# Altium PCB BOARD_2LAYER.PcbDoc (part 3 of 7)
Units mil, origin at the board's own origin, x right, y up, seen from the top; angles counter-clockwise.
Board outline 9842.52 x 9842.52 mil, 2 copper layers (Top Layer, Bottom Layer), stack 34.252 mil thick; 276 components, 129 nets, 793 pads, 303 vias.
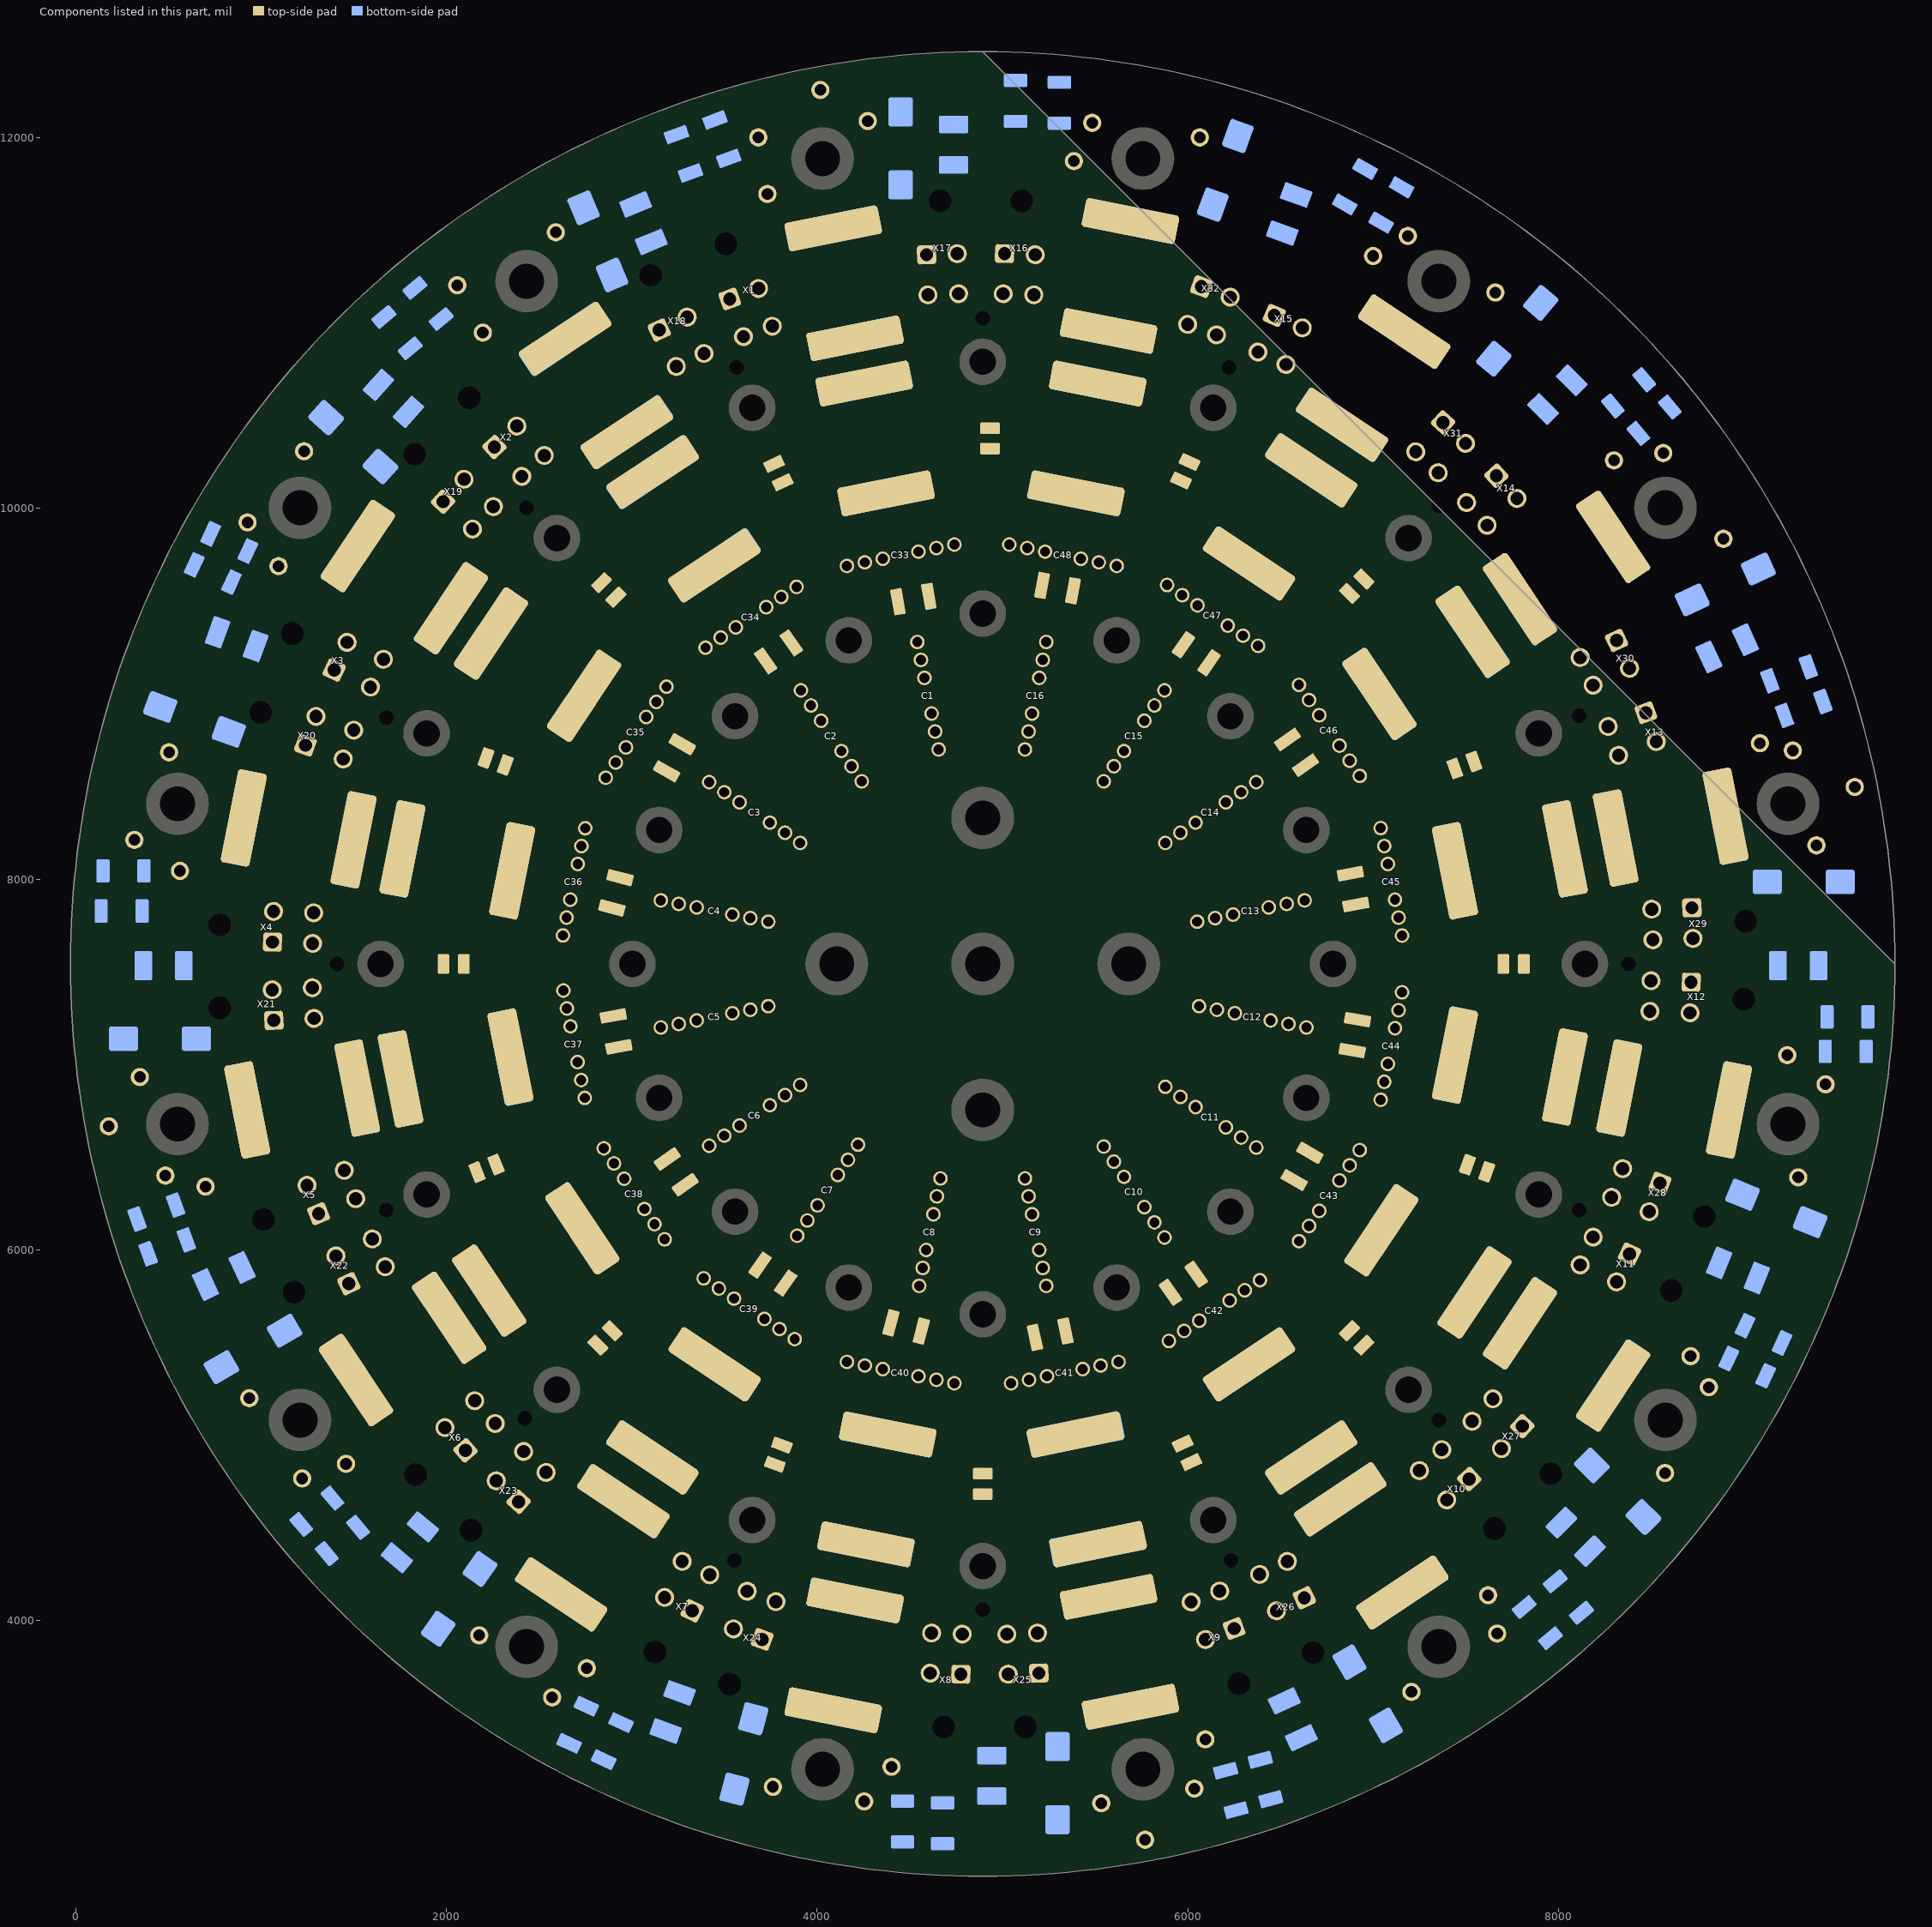
[diagram p3: the components of this part, seen from the top]

## Design rules (kind name [scope] priority, off if disabled: settings) (continued)
PolygonConnect PolygonConnect_In_$1N5825_L01_P153 [IsNamedPolygon('$1N5825_L01_P153')] p194: thpad.connectstyle=Relief thpad.reliefconductorwidth=29.53 thpad.reliefentries=4 thpad.polygonreliefangle="90 Angle" thpad.airgapwidth=19.68 smdpad.connectstyle=Relief smdpad.reliefconductorwidth=39.37 smdpad.reliefentries=4 smdpad.polygonreliefangle="90 Angle" smdpad.airgapwidth=9.84 via.connectstyle=Direct via.reliefconductorwidth=5.12 via.reliefentries=2 via.polygonreliefangle="90 Angle" via.airgapwidth=0
PolygonConnect PolygonConnect_In_$1N5825_L02_P152 [IsNamedPolygon('$1N5825_L02_P152')] p195: thpad.connectstyle=Relief thpad.reliefconductorwidth=29.53 thpad.reliefentries=4 thpad.polygonreliefangle="90 Angle" thpad.airgapwidth=19.68 smdpad.connectstyle=Relief smdpad.reliefconductorwidth=39.37 smdpad.reliefentries=4 smdpad.polygonreliefangle="90 Angle" smdpad.airgapwidth=9.84 via.connectstyle=Direct via.reliefconductorwidth=5.12 via.reliefentries=2 via.polygonreliefangle="90 Angle" via.airgapwidth=0
PolygonConnect PolygonConnect_In_$1N5272_L01_P105 [IsNamedPolygon('$1N5272_L01_P105')] p196: thpad.connectstyle=Relief thpad.reliefconductorwidth=29.53 thpad.reliefentries=4 thpad.polygonreliefangle="90 Angle" thpad.airgapwidth=19.68 smdpad.connectstyle=Relief smdpad.reliefconductorwidth=39.37 smdpad.reliefentries=4 smdpad.polygonreliefangle="90 Angle" smdpad.airgapwidth=9.84 via.connectstyle=Direct via.reliefconductorwidth=5.12 via.reliefentries=2 via.polygonreliefangle="90 Angle" via.airgapwidth=0
PolygonConnect PolygonConnect_In_~OUT_L01_P032 [IsNamedPolygon('~OUT_L01_P032')] p197: thpad.connectstyle=Relief thpad.reliefconductorwidth=29.53 thpad.reliefentries=4 thpad.polygonreliefangle="90 Angle" thpad.airgapwidth=19.68 smdpad.connectstyle=Relief smdpad.reliefconductorwidth=39.37 smdpad.reliefentries=4 smdpad.polygonreliefangle="90 Angle" smdpad.airgapwidth=9.84 via.connectstyle=Direct via.reliefconductorwidth=5.12 via.reliefentries=2 via.polygonreliefangle="90 Angle" via.airgapwidth=0
PolygonConnect PolygonConnect_In_$1N6109_L01_P181 [IsNamedPolygon('$1N6109_L01_P181')] p198: thpad.connectstyle=Relief thpad.reliefconductorwidth=29.53 thpad.reliefentries=4 thpad.polygonreliefangle="90 Angle" thpad.airgapwidth=19.68 smdpad.connectstyle=Relief smdpad.reliefconductorwidth=39.37 smdpad.reliefentries=4 smdpad.polygonreliefangle="90 Angle" smdpad.airgapwidth=9.84 via.connectstyle=Direct via.reliefconductorwidth=5.12 via.reliefentries=2 via.polygonreliefangle="90 Angle" via.airgapwidth=0
PolygonConnect PolygonConnect_In_$1N5819_L01_P146 [IsNamedPolygon('$1N5819_L01_P146')] p199: thpad.connectstyle=Relief thpad.reliefconductorwidth=29.53 thpad.reliefentries=4 thpad.polygonreliefangle="90 Angle" thpad.airgapwidth=19.68 smdpad.connectstyle=Relief smdpad.reliefconductorwidth=39.37 smdpad.reliefentries=4 smdpad.polygonreliefangle="90 Angle" smdpad.airgapwidth=9.84 via.connectstyle=Direct via.reliefconductorwidth=5.12 via.reliefentries=2 via.polygonreliefangle="90 Angle" via.airgapwidth=0
PolygonConnect PolygonConnect_In_$1N5334_L01_P109 [IsNamedPolygon('$1N5334_L01_P109')] p200: thpad.connectstyle=Relief thpad.reliefconductorwidth=29.53 thpad.reliefentries=4 thpad.polygonreliefangle="90 Angle" thpad.airgapwidth=19.68 smdpad.connectstyle=Relief smdpad.reliefconductorwidth=39.37 smdpad.reliefentries=4 smdpad.polygonreliefangle="90 Angle" smdpad.airgapwidth=9.84 via.connectstyle=Direct via.reliefconductorwidth=5.12 via.reliefentries=2 via.polygonreliefangle="90 Angle" via.airgapwidth=0
PolygonConnect PolygonConnect_In_$1N5970_L02_P168 [IsNamedPolygon('$1N5970_L02_P168')] p201: thpad.connectstyle=Relief thpad.reliefconductorwidth=29.53 thpad.reliefentries=4 thpad.polygonreliefangle="90 Angle" thpad.airgapwidth=19.68 smdpad.connectstyle=Relief smdpad.reliefconductorwidth=39.37 smdpad.reliefentries=4 smdpad.polygonreliefangle="90 Angle" smdpad.airgapwidth=9.84 via.connectstyle=Direct via.reliefconductorwidth=5.12 via.reliefentries=2 via.polygonreliefangle="90 Angle" via.airgapwidth=0
PolygonConnect PolygonConnect_In_$1N5838_L02_P160 [IsNamedPolygon('$1N5838_L02_P160')] p202: thpad.connectstyle=Relief thpad.reliefconductorwidth=29.53 thpad.reliefentries=4 thpad.polygonreliefangle="90 Angle" thpad.airgapwidth=19.68 smdpad.connectstyle=Relief smdpad.reliefconductorwidth=39.37 smdpad.reliefentries=4 smdpad.polygonreliefangle="90 Angle" smdpad.airgapwidth=9.84 via.connectstyle=Direct via.reliefconductorwidth=5.12 via.reliefentries=2 via.polygonreliefangle="90 Angle" via.airgapwidth=0
PolygonConnect PolygonConnect_In_~OUT_L01_P077 [IsNamedPolygon('~OUT_L01_P077')] p203: thpad.connectstyle=Relief thpad.reliefconductorwidth=29.53 thpad.reliefentries=4 thpad.polygonreliefangle="90 Angle" thpad.airgapwidth=19.68 smdpad.connectstyle=Relief smdpad.reliefconductorwidth=39.37 smdpad.reliefentries=4 smdpad.polygonreliefangle="90 Angle" smdpad.airgapwidth=9.84 via.connectstyle=Direct via.reliefconductorwidth=5.12 via.reliefentries=2 via.polygonreliefangle="90 Angle" via.airgapwidth=0
PolygonConnect PolygonConnect_In_$1N5335_L01_P089 [IsNamedPolygon('$1N5335_L01_P089')] p204: thpad.connectstyle=Relief thpad.reliefconductorwidth=29.53 thpad.reliefentries=4 thpad.polygonreliefangle="90 Angle" thpad.airgapwidth=19.68 smdpad.connectstyle=Relief smdpad.reliefconductorwidth=39.37 smdpad.reliefentries=4 smdpad.polygonreliefangle="90 Angle" smdpad.airgapwidth=9.84 via.connectstyle=Direct via.reliefconductorwidth=5.12 via.reliefentries=2 via.polygonreliefangle="90 Angle" via.airgapwidth=0
PolygonConnect PolygonConnect_In_~OUT_L02_P035 [IsNamedPolygon('~OUT_L02_P035')] p205: thpad.connectstyle=Relief thpad.reliefconductorwidth=29.53 thpad.reliefentries=4 thpad.polygonreliefangle="90 Angle" thpad.airgapwidth=19.68 smdpad.connectstyle=Relief smdpad.reliefconductorwidth=39.37 smdpad.reliefentries=4 smdpad.polygonreliefangle="90 Angle" smdpad.airgapwidth=9.84 via.connectstyle=Direct via.reliefconductorwidth=5.12 via.reliefentries=2 via.polygonreliefangle="90 Angle" via.airgapwidth=0
PolygonConnect PolygonConnect_In_$1N5983_L02_P176 [IsNamedPolygon('$1N5983_L02_P176')] p206: thpad.connectstyle=Relief thpad.reliefconductorwidth=29.53 thpad.reliefentries=4 thpad.polygonreliefangle="90 Angle" thpad.airgapwidth=19.68 smdpad.connectstyle=Relief smdpad.reliefconductorwidth=39.37 smdpad.reliefentries=4 smdpad.polygonreliefangle="90 Angle" smdpad.airgapwidth=9.84 via.connectstyle=Direct via.reliefconductorwidth=5.12 via.reliefentries=2 via.polygonreliefangle="90 Angle" via.airgapwidth=0
PolygonConnect PolygonConnect_In_$1N2769_L02_P131 [IsNamedPolygon('$1N2769_L02_P131')] p207: thpad.connectstyle=Relief thpad.reliefconductorwidth=29.53 thpad.reliefentries=4 thpad.polygonreliefangle="90 Angle" thpad.airgapwidth=19.68 smdpad.connectstyle=Relief smdpad.reliefconductorwidth=39.37 smdpad.reliefentries=4 smdpad.polygonreliefangle="90 Angle" smdpad.airgapwidth=9.84 via.connectstyle=Direct via.reliefconductorwidth=5.12 via.reliefentries=2 via.polygonreliefangle="90 Angle" via.airgapwidth=0
PolygonConnect PolygonConnect_In_$1N5364_L02_P216 [IsNamedPolygon('$1N5364_L02_P216')] p208: thpad.connectstyle=Relief thpad.reliefconductorwidth=29.53 thpad.reliefentries=4 thpad.polygonreliefangle="90 Angle" thpad.airgapwidth=19.68 smdpad.connectstyle=Relief smdpad.reliefconductorwidth=39.37 smdpad.reliefentries=4 smdpad.polygonreliefangle="90 Angle" smdpad.airgapwidth=9.84 via.connectstyle=Direct via.reliefconductorwidth=5.12 via.reliefentries=2 via.polygonreliefangle="90 Angle" via.airgapwidth=0
PolygonConnect PolygonConnect_In_$1N5644_L02_P129 [IsNamedPolygon('$1N5644_L02_P129')] p209: thpad.connectstyle=Relief thpad.reliefconductorwidth=29.53 thpad.reliefentries=4 thpad.polygonreliefangle="90 Angle" thpad.airgapwidth=19.68 smdpad.connectstyle=Relief smdpad.reliefconductorwidth=39.37 smdpad.reliefentries=4 smdpad.polygonreliefangle="90 Angle" smdpad.airgapwidth=9.84 via.connectstyle=Direct via.reliefconductorwidth=5.12 via.reliefentries=2 via.polygonreliefangle="90 Angle" via.airgapwidth=0
PolygonConnect PolygonConnect_In_~OUT_L02_P066 [IsNamedPolygon('~OUT_L02_P066')] p210: thpad.connectstyle=Relief thpad.reliefconductorwidth=29.53 thpad.reliefentries=4 thpad.polygonreliefangle="90 Angle" thpad.airgapwidth=19.68 smdpad.connectstyle=Relief smdpad.reliefconductorwidth=39.37 smdpad.reliefentries=4 smdpad.polygonreliefangle="90 Angle" smdpad.airgapwidth=9.84 via.connectstyle=Direct via.reliefconductorwidth=5.12 via.reliefentries=2 via.polygonreliefangle="90 Angle" via.airgapwidth=0
PolygonConnect PolygonConnect_In_D_CH-6_L02_P200 [IsNamedPolygon('D_CH-6_L02_P200')] p211: thpad.connectstyle=Relief thpad.reliefconductorwidth=29.53 thpad.reliefentries=4 thpad.polygonreliefangle="90 Angle" thpad.airgapwidth=19.68 smdpad.connectstyle=Relief smdpad.reliefconductorwidth=39.37 smdpad.reliefentries=4 smdpad.polygonreliefangle="90 Angle" smdpad.airgapwidth=9.84 via.connectstyle=Direct via.reliefconductorwidth=5.12 via.reliefentries=2 via.polygonreliefangle="90 Angle" via.airgapwidth=0
PolygonConnect PolygonConnect_In_~OUT_L01_P076 [IsNamedPolygon('~OUT_L01_P076')] p212: thpad.connectstyle=Relief thpad.reliefconductorwidth=29.53 thpad.reliefentries=4 thpad.polygonreliefangle="90 Angle" thpad.airgapwidth=19.68 smdpad.connectstyle=Relief smdpad.reliefconductorwidth=39.37 smdpad.reliefentries=4 smdpad.polygonreliefangle="90 Angle" smdpad.airgapwidth=9.84 via.connectstyle=Direct via.reliefconductorwidth=5.12 via.reliefentries=2 via.polygonreliefangle="90 Angle" via.airgapwidth=0
PolygonConnect PolygonConnect_In_$1N5825_L02_P151 [IsNamedPolygon('$1N5825_L02_P151')] p213: thpad.connectstyle=Relief thpad.reliefconductorwidth=29.53 thpad.reliefentries=4 thpad.polygonreliefangle="90 Angle" thpad.airgapwidth=19.68 smdpad.connectstyle=Relief smdpad.reliefconductorwidth=39.37 smdpad.reliefentries=4 smdpad.polygonreliefangle="90 Angle" smdpad.airgapwidth=9.84 via.connectstyle=Direct via.reliefconductorwidth=5.12 via.reliefentries=2 via.polygonreliefangle="90 Angle" via.airgapwidth=0
PolygonConnect PolygonConnect_In_~OUT_L02_P062 [IsNamedPolygon('~OUT_L02_P062')] p214: thpad.connectstyle=Relief thpad.reliefconductorwidth=29.53 thpad.reliefentries=4 thpad.polygonreliefangle="90 Angle" thpad.airgapwidth=19.68 smdpad.connectstyle=Relief smdpad.reliefconductorwidth=39.37 smdpad.reliefentries=4 smdpad.polygonreliefangle="90 Angle" smdpad.airgapwidth=9.84 via.connectstyle=Direct via.reliefconductorwidth=5.12 via.reliefentries=2 via.polygonreliefangle="90 Angle" via.airgapwidth=0
PolygonConnect PolygonConnect_In_~OUT_L01_P036 [IsNamedPolygon('~OUT_L01_P036')] p215: thpad.connectstyle=Relief thpad.reliefconductorwidth=29.53 thpad.reliefentries=4 thpad.polygonreliefangle="90 Angle" thpad.airgapwidth=19.68 smdpad.connectstyle=Relief smdpad.reliefconductorwidth=39.37 smdpad.reliefentries=4 smdpad.polygonreliefangle="90 Angle" smdpad.airgapwidth=9.84 via.connectstyle=Direct via.reliefconductorwidth=5.12 via.reliefentries=2 via.polygonreliefangle="90 Angle" via.airgapwidth=0
PolygonConnect PolygonConnect_In_$1N5242_L01_P086 [IsNamedPolygon('$1N5242_L01_P086')] p216: thpad.connectstyle=Relief thpad.reliefconductorwidth=29.53 thpad.reliefentries=4 thpad.polygonreliefangle="90 Angle" thpad.airgapwidth=19.68 smdpad.connectstyle=Relief smdpad.reliefconductorwidth=39.37 smdpad.reliefentries=4 smdpad.polygonreliefangle="90 Angle" smdpad.airgapwidth=9.84 via.connectstyle=Direct via.reliefconductorwidth=5.12 via.reliefentries=2 via.polygonreliefangle="90 Angle" via.airgapwidth=0
PolygonConnect PolygonConnect_In_$1N5457_L02_P219 [IsNamedPolygon('$1N5457_L02_P219')] p217: thpad.connectstyle=Relief thpad.reliefconductorwidth=29.53 thpad.reliefentries=4 thpad.polygonreliefangle="90 Angle" thpad.airgapwidth=19.68 smdpad.connectstyle=Relief smdpad.reliefconductorwidth=39.37 smdpad.reliefentries=4 smdpad.polygonreliefangle="90 Angle" smdpad.airgapwidth=9.84 via.connectstyle=Direct via.reliefconductorwidth=5.12 via.reliefentries=2 via.polygonreliefangle="90 Angle" via.airgapwidth=0
PolygonConnect PolygonConnect_In_$1N5614_L01_P098 [IsNamedPolygon('$1N5614_L01_P098')] p218: thpad.connectstyle=Relief thpad.reliefconductorwidth=29.53 thpad.reliefentries=4 thpad.polygonreliefangle="90 Angle" thpad.airgapwidth=19.68 smdpad.connectstyle=Relief smdpad.reliefconductorwidth=39.37 smdpad.reliefentries=4 smdpad.polygonreliefangle="90 Angle" smdpad.airgapwidth=9.84 via.connectstyle=Direct via.reliefconductorwidth=5.12 via.reliefentries=2 via.polygonreliefangle="90 Angle" via.airgapwidth=0
PolygonConnect PolygonConnect_In_$1N3215_L02_P082 [IsNamedPolygon('$1N3215_L02_P082')] p219: thpad.connectstyle=Relief thpad.reliefconductorwidth=29.53 thpad.reliefentries=4 thpad.polygonreliefangle="90 Angle" thpad.airgapwidth=19.68 smdpad.connectstyle=Relief smdpad.reliefconductorwidth=39.37 smdpad.reliefentries=4 smdpad.polygonreliefangle="90 Angle" smdpad.airgapwidth=9.84 via.connectstyle=Direct via.reliefconductorwidth=5.12 via.reliefentries=2 via.polygonreliefangle="90 Angle" via.airgapwidth=0
PolygonConnect PolygonConnect_In_$1N5210_L02_P101 [IsNamedPolygon('$1N5210_L02_P101')] p220: thpad.connectstyle=Relief thpad.reliefconductorwidth=29.53 thpad.reliefentries=4 thpad.polygonreliefangle="90 Angle" thpad.airgapwidth=19.68 smdpad.connectstyle=Relief smdpad.reliefconductorwidth=39.37 smdpad.reliefentries=4 smdpad.polygonreliefangle="90 Angle" smdpad.airgapwidth=9.84 via.connectstyle=Direct via.reliefconductorwidth=5.12 via.reliefentries=2 via.polygonreliefangle="90 Angle" via.airgapwidth=0
PolygonConnect PolygonConnect_In_D_CH-3_L02_P197 [IsNamedPolygon('D_CH-3_L02_P197')] p221: thpad.connectstyle=Relief thpad.reliefconductorwidth=29.53 thpad.reliefentries=4 thpad.polygonreliefangle="90 Angle" thpad.airgapwidth=19.68 smdpad.connectstyle=Relief smdpad.reliefconductorwidth=39.37 smdpad.reliefentries=4 smdpad.polygonreliefangle="90 Angle" smdpad.airgapwidth=9.84 via.connectstyle=Direct via.reliefconductorwidth=5.12 via.reliefentries=2 via.polygonreliefangle="90 Angle" via.airgapwidth=0
PolygonConnect PolygonConnect_In_$1N5582_L01_P124 [IsNamedPolygon('$1N5582_L01_P124')] p222: thpad.connectstyle=Relief thpad.reliefconductorwidth=29.53 thpad.reliefentries=4 thpad.polygonreliefangle="90 Angle" thpad.airgapwidth=19.68 smdpad.connectstyle=Relief smdpad.reliefconductorwidth=39.37 smdpad.reliefentries=4 smdpad.polygonreliefangle="90 Angle" smdpad.airgapwidth=9.84 via.connectstyle=Direct via.reliefconductorwidth=5.12 via.reliefentries=2 via.polygonreliefangle="90 Angle" via.airgapwidth=0
PolygonConnect PolygonConnect_In_~OUT_L02_P037 [IsNamedPolygon('~OUT_L02_P037')] p223: thpad.connectstyle=Relief thpad.reliefconductorwidth=29.53 thpad.reliefentries=4 thpad.polygonreliefangle="90 Angle" thpad.airgapwidth=19.68 smdpad.connectstyle=Relief smdpad.reliefconductorwidth=39.37 smdpad.reliefentries=4 smdpad.polygonreliefangle="90 Angle" smdpad.airgapwidth=9.84 via.connectstyle=Direct via.reliefconductorwidth=5.12 via.reliefentries=2 via.polygonreliefangle="90 Angle" via.airgapwidth=0
PolygonConnect PolygonConnect_In_$1N5334_L02_P108 [IsNamedPolygon('$1N5334_L02_P108')] p224: thpad.connectstyle=Relief thpad.reliefconductorwidth=29.53 thpad.reliefentries=4 thpad.polygonreliefangle="90 Angle" thpad.airgapwidth=19.68 smdpad.connectstyle=Relief smdpad.reliefconductorwidth=39.37 smdpad.reliefentries=4 smdpad.polygonreliefangle="90 Angle" smdpad.airgapwidth=9.84 via.connectstyle=Direct via.reliefconductorwidth=5.12 via.reliefentries=2 via.polygonreliefangle="90 Angle" via.airgapwidth=0
PolygonConnect PolygonConnect_In_~OUT_L01_P028 [IsNamedPolygon('~OUT_L01_P028')] p225: thpad.connectstyle=Relief thpad.reliefconductorwidth=29.53 thpad.reliefentries=4 thpad.polygonreliefangle="90 Angle" thpad.airgapwidth=19.68 smdpad.connectstyle=Relief smdpad.reliefconductorwidth=39.37 smdpad.reliefentries=4 smdpad.polygonreliefangle="90 Angle" smdpad.airgapwidth=9.84 via.connectstyle=Direct via.reliefconductorwidth=5.12 via.reliefentries=2 via.polygonreliefangle="90 Angle" via.airgapwidth=0
PolygonConnect PolygonConnect_In_$1N5703_L02_P137 [IsNamedPolygon('$1N5703_L02_P137')] p226: thpad.connectstyle=Relief thpad.reliefconductorwidth=29.53 thpad.reliefentries=4 thpad.polygonreliefangle="90 Angle" thpad.airgapwidth=19.68 smdpad.connectstyle=Relief smdpad.reliefconductorwidth=39.37 smdpad.reliefentries=4 smdpad.polygonreliefangle="90 Angle" smdpad.airgapwidth=9.84 via.connectstyle=Direct via.reliefconductorwidth=5.12 via.reliefentries=2 via.polygonreliefangle="90 Angle" via.airgapwidth=0
PolygonConnect "PolygonConnect_InClass_\"(Inherited)\"" [InPolygonClass('"(Inherited)"')] p227: thpad.connectstyle=Relief thpad.reliefconductorwidth=29.53 thpad.reliefentries=4 thpad.polygonreliefangle="90 Angle" thpad.airgapwidth=19.68 smdpad.connectstyle=Relief smdpad.reliefconductorwidth=39.37 smdpad.reliefentries=4 smdpad.polygonreliefangle="90 Angle" smdpad.airgapwidth=9.84 via.connectstyle=Direct via.reliefconductorwidth=5.12 via.reliefentries=2 via.polygonreliefangle="90 Angle" via.airgapwidth=0
PolygonConnect [All] p228: thpad.connectstyle=Relief thpad.reliefconductorwidth=29.53 thpad.reliefentries=4 thpad.polygonreliefangle="90 Angle" thpad.airgapwidth=19.68 smdpad.connectstyle=Relief smdpad.reliefconductorwidth=39.37 smdpad.reliefentries=4 smdpad.polygonreliefangle="90 Angle" smdpad.airgapwidth=9.84 via.connectstyle=Direct via.reliefconductorwidth=5.12 via.reliefentries=2 via.polygonreliefangle="90 Angle" via.airgapwidth=0
RoutingVias [All] p1: holewidth=28 width=50 viastyle="Through Hole" minholewidth=28 minwidth=50 maxholewidth=28 maxwidth=50
SolderMaskExpansion [All] p1: expansion=4 istentingtop=FALSE
Width [All] p1: maxlimit=10 minlimit=10 preferedwidth=10
30 further rules are at their usual default settings.

## Classes and differential pairs
polygon class "\"(Inherited)\"": $1N2769_L01_P132 $1N2769_L01_P133 $1N2769_L02_P130 $1N2769_L02_P131 $1N3213_L02_P194 $1N3215_L01_P083 $1N3215_L02_P082 $1N3217_L01_P084 $1N5209_L02_P211 $1N5210_L01_P100 $1N5210_L02_P101 $1N5211_L01_P085 $1N5240_L02_P212 $1N5241_L01_P102 $1N5241_L02_P103 $1N5242_L01_P086 $1N5271_L02_P213 $1N5272_L01_P105 $1N5272_L02_P104 $1N5273_L01_P087 $1N5302_L02_P214 $1N5303_L01_P107 $1N5303_L02_P106 $1N5304_L01_P088 $1N5333_L02_P215 $1N5334_L01_P109 $1N5334_L02_P108 $1N5335_L01_P089 $1N5364_L02_P216 $1N5365_L01_P111 $1N5365_L02_P110 $1N5366_L01_P090 $1N5395_L02_P217 $1N5396_L01_P113 $1N5396_L02_P112 $1N5397_L01_P091 $1N5426_L02_P218 $1N5427_L01_P115 $1N5427_L02_P114 $1N5428_L01_P092 $1N5457_L02_P219 $1N5458_L01_P117 $1N5458_L02_P116 $1N5459_L01_P093 $1N5488_L02_P220 $1N5489_L01_P119 $1N5489_L02_P118 $1N5490_L01_P094 $1N5519_L02_P221 $1N5520_L01_P121 $1N5520_L02_P120 $1N5521_L01_P095 $1N5550_L02_P222 $1N5551_L01_P123 $1N5551_L02_P122 $1N5552_L01_P096 $1N5581_L02_P223 $1N5582_L01_P124 $1N5582_L02_P125 $1N5583_L01_P097 $1N5612_L02_P224 $1N5613_L01_P126 $1N5613_L02_P127 $1N5614_L01_P098 $1N5643_L02_P225 $1N5644_L01_P128 $1N5644_L02_P129 $1N5645_L01_P099 $1N5703_L01_P134 $1N5703_L01_P136 $1N5703_L02_P135 $1N5703_L02_P137 $1N5742_L01_P139 $1N5742_L01_P141 $1N5742_L02_P138 $1N5742_L02_P140 $1N5781_L01_P143 $1N5781_L01_P145 $1N5781_L02_P142 $1N5781_L02_P144 $1N5819_L01_P146 $1N5819_L01_P149 $1N5819_L02_P147 $1N5819_L02_P148 $1N5825_L01_P150 $1N5825_L01_P153 $1N5825_L02_P151 $1N5825_L02_P152 $1N5831_L01_P155 $1N5831_L01_P157 $1N5831_L02_P154 $1N5831_L02_P156 $1N5838_L01_P158 $1N5838_L01_P161 $1N5838_L02_P159 $1N5838_L02_P160 $1N5964_L01_P162 $1N5964_L01_P165 $1N5964_L02_P163 $1N5964_L02_P164 $1N5970_L01_P166 $1N5970_L01_P169 $1N5970_L02_P167 $1N5970_L02_P168 $1N5976_L01_P170 $1N5976_L01_P173 $1N5976_L02_P171 $1N5976_L02_P172 $1N5983_L01_P174 $1N5983_L01_P177 $1N5983_L02_P175 $1N5983_L02_P176 $1N6109_L01_P178 $1N6109_L01_P181 $1N6109_L02_P179 $1N6109_L02_P180 $1N6115_L01_P182 $1N6115_L01_P185 $1N6115_L02_P183 $1N6115_L02_P184 $1N6121_L01_P186 $1N6121_L01_P189 $1N6121_L02_P187 $1N6121_L02_P188 $1N6128_L01_P190 $1N6128_L01_P193 $1N6128_L02_P191 $1N6128_L02_P192 D_CH-1_L02_P195 D_CH-2_L02_P196 D_CH-3_L02_P197 D_CH-4_L02_P198 D_CH-5_L02_P199 D_CH-6_L02_P200 D_CH-7_L02_P201 D_CH-8_L02_P202 D_CH-9_L02_P203 D_CH-10_L02_P204 D_CH-11_L02_P205 D_CH-12_L02_P206 D_CH-13_L02_P207 D_CH-14_L02_P208 D_CH-15_L02_P209 D_CH-16_L02_P210 ~OUT_L01_P000 ~OUT_L01_P001 ~OUT_L01_P002 ~OUT_L01_P003 ~OUT_L01_P004 ~OUT_L01_P005 ~OUT_L01_P006 ~OUT_L01_P007 ~OUT_L01_P008 ~OUT_L01_P009 ~OUT_L01_P010 ~OUT_L01_P011 ~OUT_L01_P012 ~OUT_L01_P014 ~OUT_L01_P016 ~OUT_L01_P018 ~OUT_L01_P020 ~OUT_L01_P022 ~OUT_L01_P024 ~OUT_L01_P026 ~OUT_L01_P028 ~OUT_L01_P030 ~OUT_L01_P032 ~OUT_L01_P034 ~OUT_L01_P036 ~OUT_L01_P038 ~OUT_L01_P040 ~OUT_L01_P042 ~OUT_L01_P044 ~OUT_L01_P046 ~OUT_L01_P047 ~OUT_L01_P048 ~OUT_L01_P049 ~OUT_L01_P050 ~OUT_L01_P054 ~OUT_L01_P055 ~OUT_L01_P069 ~OUT_L01_P070 ~OUT_L01_P071 ~OUT_L01_P072 ~OUT_L01_P073 ~OUT_L01_P074 ~OUT_L01_P075 ~OUT_L01_P076 ~OUT_L01_P077 ~OUT_L01_P078 ~OUT_L01_P079 ~OUT_L01_P080 ~OUT_L01_P081 ~OUT_L02_P013 ~OUT_L02_P015 ~OUT_L02_P017 ~OUT_L02_P019 ~OUT_L02_P021 ~OUT_L02_P023 ~OUT_L02_P025 ~OUT_L02_P027 ~OUT_L02_P029 ~OUT_L02_P031 ~OUT_L02_P033 ~OUT_L02_P035 ~OUT_L02_P037 ~OUT_L02_P039 ~OUT_L02_P041 ~OUT_L02_P043 ~OUT_L02_P045 ~OUT_L02_P051 ~OUT_L02_P052 ~OUT_L02_P053 ~OUT_L02_P056 ~OUT_L02_P057 ~OUT_L02_P058 ~OUT_L02_P059 ~OUT_L02_P060 ~OUT_L02_P061 ~OUT_L02_P062 ~OUT_L02_P063 ~OUT_L02_P064 ~OUT_L02_P065 ~OUT_L02_P066 ~OUT_L02_P067 ~OUT_L02_P068

## Components (designator, comment, footprint, x,y, rotation, side; value= is the part's Value field where it differs from the comment)
C1 "R76UI1100SE30J_UNIVER" CAP_PP_L15mm_UNIVER_V1 4597.72,8990.16 r101.25 bottom locked
C2 "R76UI1100SE30J_UNIVER" CAP_PP_L15mm_UNIVER_V1 4076.07,8773.62 r123.75 bottom locked
C3 "R76UI1100SE30J_UNIVER" CAP_PP_L15mm_UNIVER_V1 3662.68,8360.24 r146.25 bottom locked
C4 "R76UI1100SE30J_UNIVER" CAP_PP_L15mm_UNIVER_V1 3446.15,7828.74 r168.75 bottom locked
C5 "R76UI1100SE30J_UNIVER" CAP_PP_L15mm_UNIVER_V1 3446.15,7257.87 r191.25 bottom locked
C6 "R76UI1100SE30J_UNIVER" CAP_PP_L15mm_UNIVER_V1 3662.68,6726.38 r213.75 bottom locked
C7 "R76UI1100SE30J_UNIVER" CAP_PP_L15mm_UNIVER_V1 4056.39,6322.83 r236.25 bottom locked
C8 "R76UI1100SE30J_UNIVER" CAP_PP_L15mm_UNIVER_V1 4607.57,6096.46 r258.75 bottom locked
C9 "R76UI1100SE30J_UNIVER" CAP_PP_L15mm_UNIVER_V1 5178.43,6096.46 r281.25 bottom locked
C10 "R76UI1100SE30J_UNIVER" CAP_PP_L15mm_UNIVER_V1 5709.93,6312.99 r303.75 bottom locked
C11 "R76UI1100SE30J_UNIVER" CAP_PP_L15mm_UNIVER_V1 6123.31,6716.54 r326.25 bottom locked
C12 "R76UI1100SE30J_UNIVER" CAP_PP_L15mm_UNIVER_V1 6349.69,7257.87 r348.75 bottom locked
C13 "R76UI1100SE30J_UNIVER" CAP_PP_L15mm_UNIVER_V1 6339.85,7828.74 r11.25 bottom locked
C14 "R76UI1100SE30J_UNIVER" CAP_PP_L15mm_UNIVER_V1 6123.31,8360.24 r33.75 bottom locked
C15 "R76UI1100SE30J_UNIVER" CAP_PP_L15mm_UNIVER_V1 5709.93,8773.62 r56.25 bottom locked
C16 "R76UI1100SE30J_UNIVER" CAP_PP_L15mm_UNIVER_V1 5178.43,8990.16 r78.75 bottom
C17 "CL43C102JIHNNNE" 1812-STANDART-4532 4518.98,9511.81 r10 top
C18 "CL43C102JIHNNNE" 1812-STANDART-4532 3790.64,9226.38 r35 top
C19 "CL43C102JIHNNNE" 1812-STANDART-4532 3229.61,8655.51 r60 top
C20 "CL43C102JIHNNNE" 1812-STANDART-4532 2914.65,7927.17 r75 top
C21 "CL43C102JIHNNNE" 1812-STANDART-4532 2914.65,7179.13 r100 top
C22 "CL43C102JIHNNNE" 1812-STANDART-4532 3239.46,6421.26 r125 top
C23 "CL43C102JIHNNNE" 1812-STANDART-4532 3761.11,5870.08 r145 top
C24 "CL43C102JIHNNNE" 1812-STANDART-4532 4479.61,5584.65 r165 top
C25 "CL43C102JIHNNNE" 1812-STANDART-4532 5257.17,5545.28 r192 top
C26 "CL43C102JIHNNNE" 1812-STANDART-4532 5975.68,5820.87 r215 top
C27 "CL43C102JIHNNNE" 1812-STANDART-4532 6615.44,6450.79 r240 top
C28 "CL43C102JIHNNNE" 1812-STANDART-4532 6900.87,7159.45 r260 top
C29 "CL43C102JIHNNNE" 1812-STANDART-4532 6891.03,7946.85 r280 top
C30 "CL43C102JIHNNNE" 1812-STANDART-4532 6585.91,8685.04 r305 top
C31 "CL43C102JIHNNNE" 1812-STANDART-4532 6044.57,9216.54 r325 top
C32 "CL43C102JIHNNNE" 1812-STANDART-4532 5296.54,9570.87 r350 top
C33 "R76UI14704040J_UNIVER" CAP_PP_L15mm_UNIVER_V1 4450.09,9748.03 r191.25 bottom locked
C34 "R76UI14704040J_UNIVER" CAP_PP_L15mm_UNIVER_V1 3643,9413.39 r213.75 bottom locked
C35 "R76UI14704040J_UNIVER" CAP_PP_L15mm_UNIVER_V1 3022.92,8793.31 r236.25 bottom locked
C36 "R76UI14704040J_UNIVER" CAP_PP_L15mm_UNIVER_V1 2688.28,7986.22 r258.25 bottom locked
C37 "R76UI14704040J_UNIVER" CAP_PP_L15mm_UNIVER_V1 2688.28,7110.24 r281.25 bottom locked
C38 "R76UI14704040J_UNIVER" CAP_PP_L15mm_UNIVER_V1 3013.08,6303.15 r303.75 bottom locked
C39 "R76UI14704040J_UNIVER" CAP_PP_L15mm_UNIVER_V1 3633.16,5683.07 r326.25 bottom locked
C40 "R76UI14704040J_UNIVER" CAP_PP_L15mm_UNIVER_V1 4450.09,5338.58 r348.75 bottom locked
C41 "R76UI14704040J_UNIVER" CAP_PP_L15mm_UNIVER_V1 5335.91,5338.58 r11.25 bottom locked
C42 "R76UI14704040J_UNIVER" CAP_PP_L15mm_UNIVER_V1 6143,5673.23 r33.75 bottom locked
C43 "R76UI14704040J_UNIVER" CAP_PP_L15mm_UNIVER_V1 6763.08,6293.31 r56.25 bottom locked
C44 "R76UI14704040J_UNIVER" CAP_PP_L15mm_UNIVER_V1 7097.72,7100.39 r78.75 bottom locked
C45 "R76UI14704040J_UNIVER" CAP_PP_L15mm_UNIVER_V1 7097.72,7986.22 r101.25 bottom
C46 "R76UI14704040J_UNIVER" CAP_PP_L15mm_UNIVER_V1 6763.08,8803.15 r123.75 bottom locked
C47 "R76UI14704040J_UNIVER" CAP_PP_L15mm_UNIVER_V1 6133.16,9423.23 r146.25 bottom locked
C48 "R76UI14704040J_UNIVER" CAP_PP_L15mm_UNIVER_V1 5326.07,9748.03 r168.75 bottom locked
L1 "SRP1770TA-330M" 1770TA_SERIES_16t9x16t9_H7 4144.97,11214.57 r281.25 bottom locked
L2 "SRP1770TA-330M" 1770TA_SERIES_16t9x16t9_H7 4312.29,10377.95 r281.25 bottom locked
L3 "SRP1770TA-330M" 1770TA_SERIES_16t9x16t9_H7 4312.29,10377.95 r101.25 top locked
L4 "SRP1770TA-330M" 1770TA_SERIES_16t9x16t9_H7 4144.97,11214.57 r101.25 top locked
L5 "SRP1770TA-330M" 1770TA_SERIES_16t9x16t9_H7 2806.39,10663.39 r303.75 bottom locked
L6 "SRP1770TA-330M" 1770TA_SERIES_16t9x16t9_H7 3278.83,9944.88 r303.75 bottom locked
L7 "SRP1770TA-330M" 1770TA_SERIES_16t9x16t9_H7 3278.83,9944.88 r123.25 top locked
L8 "SRP1770TA-330M" 1770TA_SERIES_16t9x16t9_H7 2806.39,10663.39 r123.25 top locked
L9 "SRP1770TA-330M" 1770TA_SERIES_16t9x16t9_H7 1772.92,9629.92 r326.25 bottom locked
L10 "SRP1770TA-330M" 1770TA_SERIES_16t9x16t9_H7 2491.42,9157.48 r326.25 bottom locked
L11 "SRP1770TA-330M" 1770TA_SERIES_16t9x16t9_H7 2491.42,9157.48 r146.25 top locked
L12 "SRP1770TA-330M" 1770TA_SERIES_16t9x16t9_H7 1772.92,9629.92 r146.25 top locked
L13 "SRP1770TA-330M" 1770TA_SERIES_16t9x16t9_H7 1202.05,8271.65 r348.75 bottom locked
L14 "SRP1770TA-330M" 1770TA_SERIES_16t9x16t9_H7 2058.35,8104.33 r348.75 bottom locked
L15 "SRP1770TA-330M" 1770TA_SERIES_16t9x16t9_H7 2058.35,8104.33 r168.75 top locked
L16 "SRP1770TA-330M" 1770TA_SERIES_16t9x16t9_H7 1202.05,8271.65 r168.75 top locked
L17 "SRP1770TA-330M" 1770TA_SERIES_16t9x16t9_H7 1221.74,6814.96 r11.25 bottom locked
L18 "SRP1770TA-330M" 1770TA_SERIES_16t9x16t9_H7 2048.51,6982.28 r11.25 bottom locked
L19 "SRP1770TA-330M" 1770TA_SERIES_16t9x16t9_H7 2048.51,6982.28 r191.25 top locked
L20 "SRP1770TA-330M" 1770TA_SERIES_16t9x16t9_H7 1221.74,6814.96 r191.25 top locked
L21 "SRP1770TA-330M" 1770TA_SERIES_16t9x16t9_H7 1763.08,5466.54 r33.75 bottom locked
L22 "SRP1770TA-330M" 1770TA_SERIES_16t9x16t9_H7 2481.58,5948.82 r33.75 bottom locked
L23 "SRP1770TA-330M" 1770TA_SERIES_16t9x16t9_H7 2481.58,5948.82 r213.75 top locked
L24 "SRP1770TA-330M" 1770TA_SERIES_16t9x16t9_H7 1763.08,5466.54 r213.75 top locked
L25 "SRP1770TA-330M" 1770TA_SERIES_16t9x16t9_H7 2786.7,4393.7 r56.25 bottom locked
L26 "SRP1770TA-330M" 1770TA_SERIES_16t9x16t9_H7 3278.83,5131.89 r56.25 bottom locked
L27 "SRP1770TA-330M" 1770TA_SERIES_16t9x16t9_H7 3278.83,5131.89 r236.25 top locked
L28 "SRP1770TA-330M" 1770TA_SERIES_16t9x16t9_H7 2786.7,4393.7 r236.25 top locked
L29 "SRP1770TA-330M" 1770TA_SERIES_16t9x16t9_H7 4144.97,3812.99 r78.75 bottom locked
L30 "SRP1770TA-330M" 1770TA_SERIES_16t9x16t9_H7 4322.13,4708.66 r78.75 bottom locked
L31 "SRP1770TA-330M" 1770TA_SERIES_16t9x16t9_H7 4322.13,4708.66 r258.75 top locked
L32 "SRP1770TA-330M" 1770TA_SERIES_16t9x16t9_H7 4144.97,3812.99 r258.75 top locked
L33 "SRP1770TA-330M" 1770TA_SERIES_16t9x16t9_H7 5631.19,3832.68 r101.25 bottom locked
L34 "SRP1770TA-330M" 1770TA_SERIES_16t9x16t9_H7 5454.02,4708.66 r101.25 bottom locked
L35 "SRP1770TA-330M" 1770TA_SERIES_16t9x16t9_H7 5454.02,4708.66 r281.75 top locked
L36 "SRP1770TA-330M" 1770TA_SERIES_16t9x16t9_H7 5631.19,3832.68 r281.25 top locked
L37 "SRP1770TA-330M" 1770TA_SERIES_16t9x16t9_H7 6989.46,4403.54 r123.75 bottom locked
L38 "SRP1770TA-330M" 1770TA_SERIES_16t9x16t9_H7 6497.33,5131.89 r123.75 bottom locked
L39 "SRP1770TA-330M" 1770TA_SERIES_16t9x16t9_H7 6497.33,5131.89 r303.75 top locked
L40 "SRP1770TA-330M" 1770TA_SERIES_16t9x16t9_H7 6989.46,4403.54 r303.75 top locked
L41 "SRP1770TA-330M" 1770TA_SERIES_16t9x16t9_H7 8042.61,5437.01 r146.25 bottom locked
L42 "SRP1770TA-330M" 1770TA_SERIES_16t9x16t9_H7 7294.57,5938.98 r146.25 bottom locked
L43 "SRP1770TA-330M" 1770TA_SERIES_16t9x16t9_H7 7294.57,5938.98 r326.25 top locked
L44 "SRP1770TA-330M" 1770TA_SERIES_16t9x16t9_H7 8042.61,5437.01 r326.25 top locked
L45 "SRP1770TA-330M" 1770TA_SERIES_16t9x16t9_H7 8623.31,6814.96 r168.75 bottom locked
L46 "SRP1770TA-330M" 1770TA_SERIES_16t9x16t9_H7 7737.49,6992.13 r168.75 bottom locked
L47 "SRP1770TA-330M" 1770TA_SERIES_16t9x16t9_H7 7737.49,6992.13 r348.75 top locked
L48 "SRP1770TA-330M" 1770TA_SERIES_16t9x16t9_H7 8623.31,6814.96 r348.75 top locked
L49 "SRP1770TA-330M" 1770TA_SERIES_16t9x16t9_H7 8603.63,8281.5 r191.25 bottom locked
L50 "SRP1770TA-330M" 1770TA_SERIES_16t9x16t9_H7 7737.49,8104.33 r191.25 bottom locked
L51 "SRP1770TA-330M" 1770TA_SERIES_16t9x16t9_H7 7737.49,8104.33 r11.25 top locked
L52 "SRP1770TA-330M" 1770TA_SERIES_16t9x16t9_H7 8603.63,8281.5 r11.25 top locked
L53 "SRP1770TA-330M" 1770TA_SERIES_16t9x16t9_H7 8042.61,9679.13 r213.75 bottom locked
L54 "SRP1770TA-330M" 1770TA_SERIES_16t9x16t9_H7 7284.73,9167.32 r213.75 bottom locked
L55 "SRP1770TA-330M" 1770TA_SERIES_16t9x16t9_H7 7284.73,9167.32 r33.75 top locked
L56 "SRP1770TA-330M" 1770TA_SERIES_16t9x16t9_H7 8042.61,9679.13 r33.75 top locked
L57 "SRP1770TA-330M" 1770TA_SERIES_16t9x16t9_H7 6999.3,10702.76 r236.25 bottom locked
L58 "SRP1770TA-330M" 1770TA_SERIES_16t9x16t9_H7 6497.33,9954.72 r236.25 bottom locked
L59 "SRP1770TA-330M" 1770TA_SERIES_16t9x16t9_H7 6497.33,9954.72 r56.25 top locked
L60 "SRP1770TA-330M" 1770TA_SERIES_16t9x16t9_H7 6999.3,10702.76 r56.25 top locked
L61 "SRP1770TA-330M" 1770TA_SERIES_16t9x16t9_H7 5631.19,11253.94 r258.75 bottom locked
L62 "SRP1770TA-330M" 1770TA_SERIES_16t9x16t9_H7 5454.02,10377.95 r258.75 bottom locked
L63 "SRP1770TA-330M" 1770TA_SERIES_16t9x16t9_H7 5454.02,10377.95 r78.75 top locked
L64 "SRP1770TA-330M" 1770TA_SERIES_16t9x16t9_H7 5631.19,11253.94 r78.75 top locked
L65 "SRP6540-220M" 6540_SRP_SERIES_7t5x6t5_H4 4735.52,11962.6 r270 bottom
L66 "SRP6540-220M" 6540_SRP_SERIES_7t5x6t5_H4 3062.29,11539.37 r292.5 bottom
L67 "SRP6540-220M" 6540_SRP_SERIES_7t5x6t5_H4 1713.87,10594.49 r318 bottom
L68 "SRP6540-220M" 6540_SRP_SERIES_7t5x6t5_H4 867.41,9295.28 r340 bottom
L69 "SRP6540-220M" 6540_SRP_SERIES_7t5x6t5_H4 473.71,7533.46 r0 bottom
L70 "SRP6540-220M" 6540_SRP_SERIES_7t5x6t5_H4 798.51,5860.24 r25 bottom
L71 "SRP6540-220M" 6540_SRP_SERIES_7t5x6t5_H4 1802.45,4423.23 r50 bottom
L72 "SRP6540-220M" 6540_SRP_SERIES_7t5x6t5_H4 3219.77,3507.87 r70 bottom
L73 "SRP6540-220M" 6540_SRP_SERIES_7t5x6t5_H4 4942.21,3163.39 r90 bottom
L74 "SRP6540-220M" 6540_SRP_SERIES_7t5x6t5_H4 6566.23,3468.5 r115 bottom
L75 "SRP6540-220M" 6540_SRP_SERIES_7t5x6t5_H4 8091.82,4452.76 r135 bottom
L76 "SRP6540-220M" 6540_SRP_SERIES_7t5x6t5_H4 8967.8,5889.76 r158 bottom
L77 "SRP6540-220M" 6540_SRP_SERIES_7t5x6t5_H4 9292.61,7533.46 r180 bottom
L78 "SRP6540-220M" 6540_SRP_SERIES_7t5x6t5_H4 8908.75,9246.06 r205 bottom
L79 "SRP6540-220M" 6540_SRP_SERIES_7t5x6t5_H4 7993.39,10614.17 r225 bottom
L80 "SRP6540-220M" 6540_SRP_SERIES_7t5x6t5_H4 6546.54,11588.58 r250 bottom
R1 "4-1879021-9" SMW-SMF-3W 4450.09,11942.91 r90 bottom
R2 "4-1879021-9" SMW-SMF-3W 2816.23,11440.94 r113 bottom
R3 "4-1879021-9" SMW-SMF-3W 1497.33,10358.27 r138 bottom
R4 "4-1879021-9" SMW-SMF-3W 641.03,8862.2 r160 bottom
R5 "4-1879021-9" SMW-SMF-3W 454.02,7139.76 r180 bottom
R6 "4-1879021-9" SMW-SMF-3W 955.99,5466.54 r210 bottom
R7 "4-1879021-9" SMW-SMF-3W 2068.2,4118.11 r235 bottom
R8 "4-1879021-9" SMW-SMF-3W 3603.63,3281.5 r255 bottom
R9 "4-1879021-9" SMW-SMF-3W 5296.54,3124.02 r270 bottom
R10 "4-1879021-9" SMW-SMF-3W 6969.77,3606.3 r300 bottom
R11 "4-1879021-9" SMW-SMF-3W 8318.2,4698.82 r315 bottom
R12 "4-1879021-9" SMW-SMF-3W 9174.5,6224.41 r338 bottom
R13 "4-1879021-9" SMW-SMF-3W 9322.13,7986.22 r0 bottom
R14 "4-1879021-9" SMW-SMF-3W 8898.91,9590.55 r25 bottom
R15 "4-1879021-9" SMW-SMF-3W 7776.86,10958.66 r50 bottom
R16 "4-1879021-9" SMW-SMF-3W 6202.05,11824.8 r70 bottom
R17 "MCR25JZHJ000" 1210-STANDART-3225 3790.64,10190.94 r295 top
R18 "MCR25JZHJ000" 1210-STANDART-3225 2875.28,9561.02 r315 top
R19 "MCR25JZHJ000" 1210-STANDART-3225 2265.05,8635.83 r340 top
R20 "MCR25JZHJ000" 1210-STANDART-3225 2038.67,7543.31 r0 top
R21 "MCR25JZHJ000" 1210-STANDART-3225 2215.83,6440.94 r22 top
R22 "MCR25JZHJ000" 1210-STANDART-3225 2855.6,5525.59 r45 top
R23 "MCR25JZHJ000" 1210-STANDART-3225 3790.64,4895.67 r70 top
R24 "MCR25JZHJ000" 1210-STANDART-3225 4893,4738.19 r90 top
R25 "MCR25JZHJ000" 1210-STANDART-3225 5995.36,4905.51 r115 top
R26 "MCR25JZHJ000" 1210-STANDART-3225 6910.72,5525.59 r135 top
R27 "MCR25JZHJ000" 1210-STANDART-3225 7560.32,6440.94 r160 top
R28 "MCR25JZHJ000" 1210-STANDART-3225 7757.17,7543.31 r180 top
R29 "MCR25JZHJ000" 1210-STANDART-3225 7491.42,8616.14 r200 top
R30 "MCR25JZHJ000" 1210-STANDART-3225 6910.72,9580.71 r225 top
R31 "MCR25JZHJ000" 1210-STANDART-3225 5985.52,10200.79 r245 top
R32 "MCR25JZHJ000" 1210-STANDART-3225 4932.37,10377.95 r270 top
R33 "CRM2512-FX-R100ELF" 2512-STANDART-6332 3278.83,11913.39 r290 bottom
R34 "CRM2512-FX-R100ELF" 2512-STANDART-6332 3485.52,11992.13 r290 bottom
R35 "CRM2512-FX-R100ELF" 2512-STANDART-6332 1900.87,11106.3 r310 bottom
R36 "CRM2512-FX-R100ELF" 2512-STANDART-6332 1733.55,10948.82 r310 bottom
R37 "CRM2512-FX-R100ELF" 2512-STANDART-6332 739.46,9649.61 r335 bottom
R38 "CRM2512-FX-R100ELF" 2512-STANDART-6332 828.04,9816.93 r335 bottom
R39 "CRM2512-FX-R100ELF" 2512-STANDART-6332 257.17,8045.28 r0 bottom
R40 "CRM2512-FX-R100ELF" 2512-STANDART-6332 247.33,7828.74 r0 bottom
R41 "CRM2512-FX-R100ELF" 2512-STANDART-6332 493.39,6017.72 r20 bottom
R42 "CRM2512-FX-R100ELF" 2512-STANDART-6332 434.34,6204.72 r20 bottom
R43 "CRM2512-FX-R100ELF" 2512-STANDART-6332 1300.48,4590.55 r40 bottom
R44 "CRM2512-FX-R100ELF" 2512-STANDART-6332 1438.28,4433.07 r40 bottom
R45 "CRM2512-FX-R100ELF" 2512-STANDART-6332 2707.96,3438.98 r65 bottom
R46 "CRM2512-FX-R100ELF" 2512-STANDART-6332 2894.97,3350.39 r65 bottom
R47 "CRM2512-FX-R100ELF" 2512-STANDART-6332 4459.93,2917.32 r90 bottom
R48 "CRM2512-FX-R100ELF" 2512-STANDART-6332 4676.46,2907.48 r90 bottom
R49 "CRM2512-FX-R100ELF" 2512-STANDART-6332 6231.58,3084.65 r105 bottom
R50 "CRM2512-FX-R100ELF" 2512-STANDART-6332 6418.59,3143.7 r105 bottom
R51 "CRM2512-FX-R100ELF" 2512-STANDART-6332 8052.45,4127.95 r130 bottom
R52 "CRM2512-FX-R100ELF" 2512-STANDART-6332 7885.13,3990.16 r130 bottom
R53 "CRM2512-FX-R100ELF" 2512-STANDART-6332 9105.6,5545.28 r155 bottom
R54 "CRM2512-FX-R100ELF" 2512-STANDART-6332 9017.02,5368.11 r155 bottom
R55 "CRM2512-FX-R100ELF" 2512-STANDART-6332 9548.51,7070.87 r180 bottom
R56 "CRM2512-FX-R100ELF" 2512-STANDART-6332 9558.35,7257.87 r180 bottom
R57 "CRM2512-FX-R100ELF" 2512-STANDART-6332 9322.13,8921.26 r200 bottom
R58 "CRM2512-FX-R100ELF" 2512-STANDART-6332 9243.39,9108.27 r200 bottom
R59 "CRM2512-FX-R100ELF" 2512-STANDART-6332 8377.25,10624.02 r220 bottom
R60 "CRM2512-FX-R100ELF" 2512-STANDART-6332 8515.05,10476.38 r220 bottom
R61 "CRM2512-FX-R100ELF" 2512-STANDART-6332 7097.72,11637.8 r240 bottom
R62 "CRM2512-FX-R100ELF" 2512-STANDART-6332 6900.87,11736.22 r240 bottom
R63 "CRM2512-FX-R100ELF" 2512-STANDART-6332 5070.17,12198.82 r270 bottom
R64 "CRM2512-FX-R100ELF" 2512-STANDART-6332 5306.39,12188.98 r270 bottom
TP1 "5013" TEST-POINTS-1 3731.58,11696.85 r0 top
TP2 "5013" TEST-POINTS-1 2196.15,10948.82 r0 top
TP3 "5013" TEST-POINTS-1 1093.79,9688.98 r0 top
TP4 "5013" TEST-POINTS-1 562.29,8045.28 r0 top
TP5 "5013" TEST-POINTS-1 700.09,6342.52 r0 top
TP6 "5013" TEST-POINTS-1 1457.96,4846.46 r0 top
TP7 "5013" TEST-POINTS-1 2757.17,3744.09 r0 top
TP8 "5013" TEST-POINTS-1 4400.87,3212.6 r0 top
TP9 "5013" TEST-POINTS-1 6093.79,3360.24 r0 top
TP10 "5013" TEST-POINTS-1 7619.38,4137.8 r0 top
TP11 "5013" TEST-POINTS-1 8711.9,5427.17 r0 top
TP12 "5013" TEST-POINTS-1 9233.55,7051.18 r0 top
TP13 "5013" TEST-POINTS-1 9085.91,8734.25 r0 top
TP14 "5013" TEST-POINTS-1 8298.51,10259.84 r0 top
TP15 "5013" TEST-POINTS-1 6999.3,11362.2 r0 top
TP16 "5013" TEST-POINTS-1 5385.13,11874.02 r0 top
TP17 "5125" TEST-POINTS-1 3682.37,12001.97 r0 top
TP18 "5125" TEST-POINTS-1 4272.92,12090.55 r0 top
TP19 "5125" TEST-POINTS-1 2058.35,11204.72 r0 top
TP20 "5125" TEST-POINTS-1 2589.85,11490.16 r0 top
TP21 "5125" TEST-POINTS-1 926.46,9925.2 r0 top
TP22 "5125" TEST-POINTS-1 1231.58,10309.06 r0 top
TP23 "5125" TEST-POINTS-1 316.23,8212.6 r0 top
TP24 "5125" TEST-POINTS-1 503.24,8685.04 r0 top
TP25 "5125" TEST-POINTS-1 483.55,6401.57 r0 top
TP26 "5125" TEST-POINTS-1 345.76,6933.07 r0 top
TP27 "5125" TEST-POINTS-1 1221.74,4767.72 r0 top
TP28 "5125" TEST-POINTS-1 936.31,5200.79 r0 top
TP29 "5125" TEST-POINTS-1 2570.17,3586.61 r0 top
TP30 "5125" TEST-POINTS-1 2176.46,3921.26 r0 top
TP31 "5125" TEST-POINTS-1 4253.24,3025.59 r0 top
TP32 "5125" TEST-POINTS-1 3761.11,3104.33 r0 top
TP33 "5125" TEST-POINTS-1 6034.73,3094.49 r0 top
TP34 "5125" TEST-POINTS-1 5532.76,3015.75 r0 top
TP35 "5125" TEST-POINTS-1 7668.59,3931.1 r0 top
TP36 "5125" TEST-POINTS-1 7205.99,3616.14 r0 top
TP37 "5125" TEST-POINTS-1 8810.32,5259.84 r0 top
TP38 "5125" TEST-POINTS-1 8574.1,4797.24 r0 top
TP39 "5125" TEST-POINTS-1 9440.24,6893.7 r0 top
TP40 "5125" TEST-POINTS-1 9292.61,6391.73 r0 top
TP41 "5125" TEST-POINTS-1 9263.08,8694.88 r0 top
TP42 "5125" TEST-POINTS-1 9391.03,8183.07 r0 top
TP43 "5125" TEST-POINTS-1 8564.26,10299.21 r0 top
TP44 "5125" TEST-POINTS-1 8889.06,9836.61 r0 top
TP45 "5125" TEST-POINTS-1 7186.31,11470.47 r0 top
TP46 "5125" TEST-POINTS-1 7658.75,11165.35 r0 top
TP47 "5125" TEST-POINTS-1 5483.55,12080.71 r0 top
TP48 "5125" TEST-POINTS-1 6064.26,12001.97 r0 top
TP49 "5011" TEST-POINTS-1 4017.02,12257.87 r0 top
TP50 "5011" TEST-POINTS-1 9597.72,8498.03 r0 top
TP51 "5011" TEST-POINTS-1 5768.98,2818.9 r0 top
TP52 "5011" TEST-POINTS-1 178.43,6667.32 r0 top
X1 "0039301040" 2Rx4K_ANGLE 3643,11057.09 r200 top locked
X2 "0039301040" 2Rx4K_ANGLE 2393,10309.06 r223 top locked
X3 "0039301040" 2Rx4K_ANGLE 1526.86,9157.48 r245 top locked
X4 "0039301040" 2Rx4K_ANGLE 1172.53,7740.16 r268 top locked
X5 "0039301040" 2Rx4K_ANGLE 1379.22,6312.99 r292 top locked
X6 "0039301040" 2Rx4K_ANGLE 2127.25,5053.15 r312 top locked
X7 "0039301040" 2Rx4K_ANGLE 3298.51,4187.01 r334 top locked
X8 "0039301040" 2Rx4K_ANGLE 4696.15,3822.83 r358 top locked
X9 "0039301040" 2Rx4K_ANGLE 6133.16,4029.53 r21 top locked
X10 "0039301040" 2Rx4K_ANGLE 7383.16,4787.4 r43 top locked
X11 "0039301040" 2Rx4K_ANGLE 8249.3,5948.82 r65 top locked
X12 "0039301040" 2Rx4K_ANGLE 8603.63,7366.14 r88 top locked
X13 "0039301040" 2Rx4K_ANGLE 8396.94,8783.46 r110 top locked
X14 "0039301040" 2Rx4K_ANGLE 7639.06,10043.31 r132 top locked
X15 "0039301040" 2Rx4K_ANGLE 6497.33,10909.45 r156 top locked
X16 "0039301040" 2Rx4K_ANGLE 5089.85,11263.78 r178 top locked
X17 "0039301040" 2Rx4K_ANGLE 4676.46,11263.78 r182 top locked
X18 "0039301040" 2Rx4K_ANGLE 3268.98,10899.61 r205 top locked
X19 "0039301040" 2Rx4K_ANGLE 2117.41,10023.62 r227 top locked
X20 "0039301040" 2Rx4K_ANGLE 1369.38,8763.78 r250 top locked
X21 "0039301040" 2Rx4K_ANGLE 1172.53,7326.77 r273 top locked
X22 "0039301040" 2Rx4K_ANGLE 1536.7,5938.98 r295 top locked
X23 "0039301040" 2Rx4K_ANGLE 2402.84,4777.56 r317 top locked
X24 "0039301040" 2Rx4K_ANGLE 3662.68,4029.53 r340 top locked
X25 "0039301040" 2Rx4K_ANGLE 5109.54,3822.83 r2 top locked
X26 "0039301040" 2Rx4K_ANGLE 6507.17,4187.01 r25 top locked
X27 "0039301040" 2Rx4K_ANGLE 7668.59,5062.99 r47 top locked
X28 "0039301040" 2Rx4K_ANGLE 8416.62,6322.83 r69 top locked
X29 "0039301040" 2Rx4K_ANGLE 8613.47,7759.84 r92 top locked
X30 "0039301040" 2Rx4K_ANGLE 8249.3,9167.32 r115 top locked
X31 "0039301040" 2Rx4K_ANGLE 7363.47,10328.74 r137 top locked
X32 "0039301040" 2Rx4K_ANGLE 6113.47,11066.93 r160 top locked

## Footprints (in the part's own frame and the unit in brackets; to place one, negate y for a bottom-side part, rotate by r counter-clockwise, add the part's x,y. Pads: shape width x height; smd on the part's side, far side on the other; paste and mask are expansions set on the pad)
2Rx4K_ANGLE [mm]
  rrect30% 2.6x2.6 / inner rrect28% 2.8x2.8 / far side rrect28% 2.6x2.6 hole 1.8 paste-2539.97 mask+0.1: 1(2.1,-2.75)
  round 2.6 / inner round 2.8 / far side round 2.6 hole 1.8 paste-2539.97 mask+0.1: 2(-2.1,-2.75) 3(2.1,2.75) 4(-2.1,2.75)
  round 0 hole 3.1 unplated paste-2539.97 mask+0: ""(0,-10.05)
  silkscreen extent -5.05,-14.25 4.55,-3.8, body extent -5.05,-14.25 4.55,-3.8, height 0.03
1210-STANDART-3225 [mm]
  rrect25% 1.6x2.7 smd paste-0.05 mask+0.1: 1(-1.4,0) 2(1.4,0)
  silkscreen extent -1.68,-1.32 1.67,1.32, body extent -1.68,-1.32 1.67,1.32, height 0.03
1770TA_SERIES_16t9x16t9_H7 [mm]
  rrect24% 4x13 smd paste-0.1 mask+0.1: 1(-7.675,0) 2(7.675,0)
  silkscreen extent -8.55,-8.55 8.55,8.55, body extent -8.55,-8.55 8.55,8.55, height 0.03
1812-STANDART-4532 [mm]
  rrect25% 1.6x3.6 smd paste-0.05 mask+0.1: 1(-2.15,0) 2(2.15,0)
  silkscreen extent -2.4,-1.75 2.4,1.75, body extent -2.4,-1.75 2.4,1.75, height 0.03
2512-STANDART-6332 [mm]
  rrect22% 1.8x3.2 smd paste-0.05 mask+0.1: 1(-2.8,0) 2(2.8,0)
  silkscreen extent -3.23,-1.7 3.22,1.7, body extent -3.23,-1.7 3.22,1.7, height 0.03
6540_SRP_SERIES_7t5x6t5_H4 [mm]
  rrect16% 2.4x4 smd paste-0.05 mask+0.1: 1(-2.775,0) 2(2.775,0)
  silkscreen extent -3.75,-3.35 3.75,3.35, body extent -3.75,-3.35 3.75,3.35, height 0.03
CAP_PP_L15mm_UNIVER_V1 [mm]
  round 2 hole 1.4 paste-2539.97 mask+0.1: 1(-7.5,0) 2(7.5,0) ""(-5,0) ""(-2.5,0) ""(2.5,0) ""(5,0)
  silkscreen extent -10,-5 10,5, body extent -10,-5 10,5, height 0.03
SMW-SMF-3W [mm]
  rrect23% 4x3.4 smd paste-0.05 mask+0.1: 1(-5,0) 2(5,0)
  silkscreen extent -5.4,-2.9 5.4,2.9, body extent -5.4,-2.9 5.4,2.9, height 0.03
TEST-POINTS-1 [mm]
  round 2.5 hole 1.6 paste-2539.97 mask+0.05: 1(0,0)
  silkscreen extent -1.6,-1.6 1.6,1.6, body extent -1.6,-1.6 1.6,1.6, height 0.03